# Altium PCB Grabber.PCBDOC (part 3 of 5)
Units mm, origin at the board's own origin, x right, y up, seen from the top; angles counter-clockwise.
Board outline 72.5 x 100 mm, 4 copper layers (TopLayer, Internal Plane 2, Layer 1, Bottom Layer), stack 1.543 mm thick; 160 components, 116 nets, 692 pads, 242 vias.
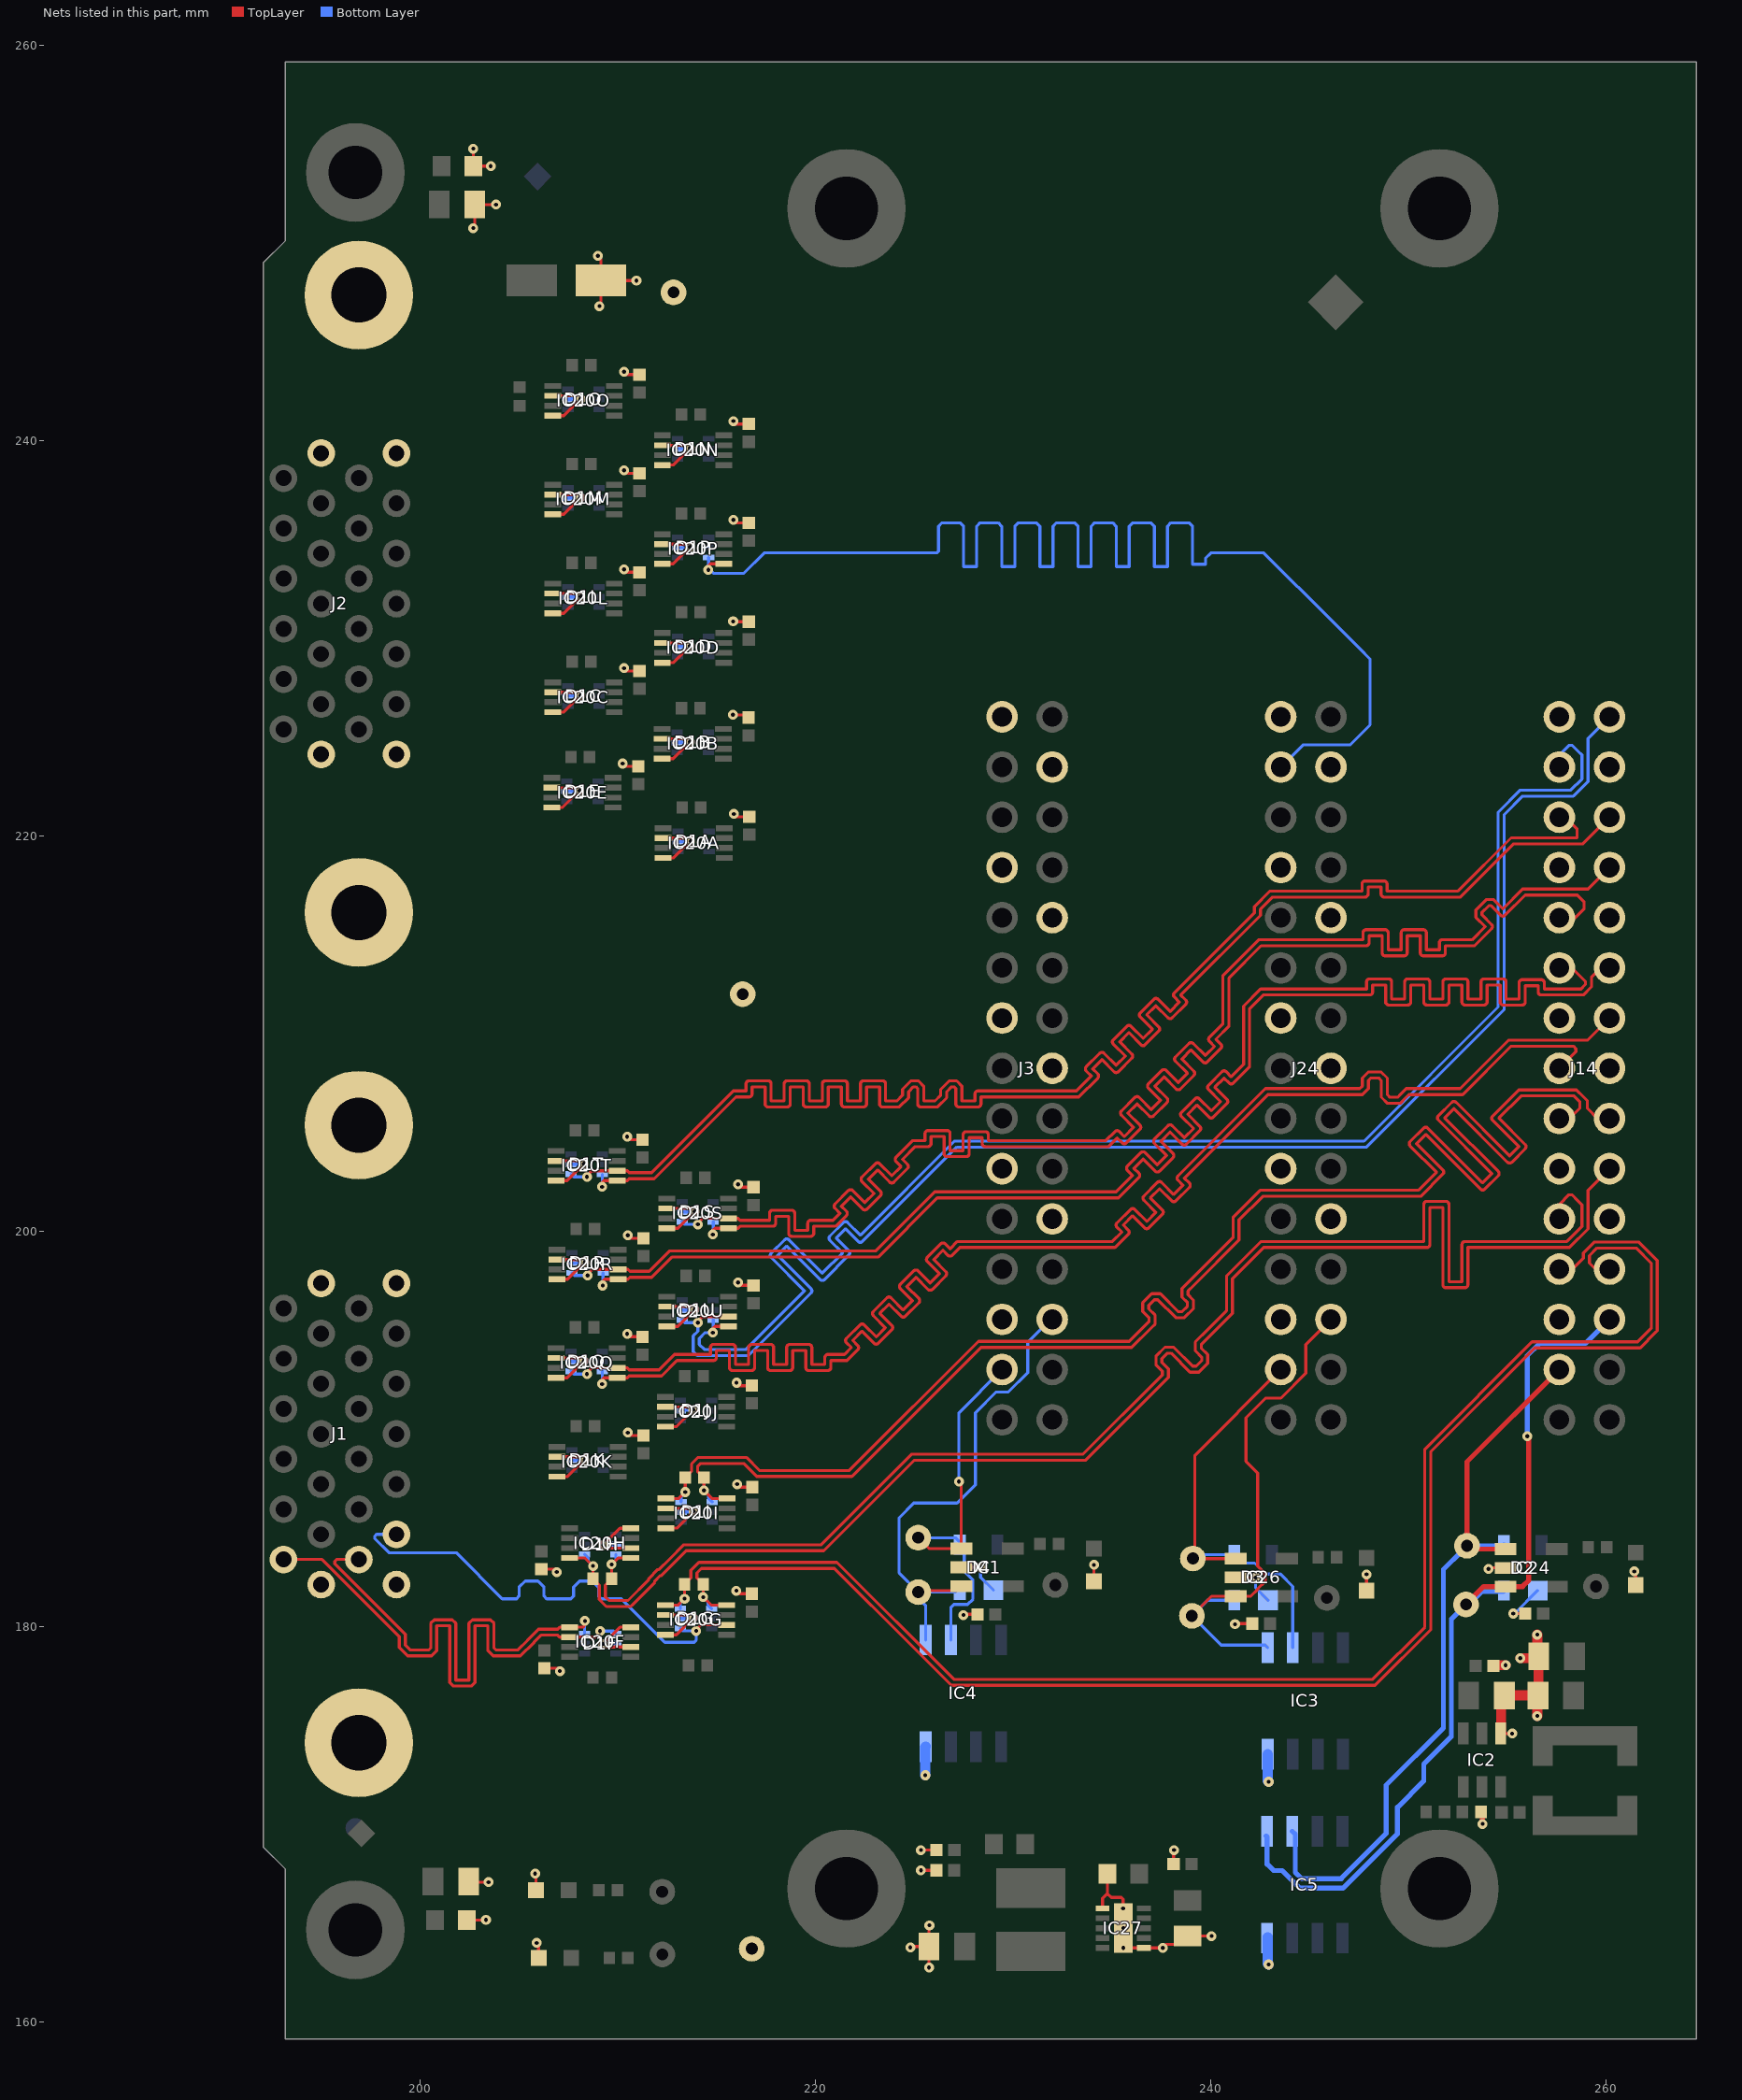
[diagram p4: the nets of this part, all layers, seen from the top]

## Via types
v1: diameter 0.5, hole 0.2, TopLayer to Bottom Layer, tented both sides, 242 vias

## Nets (pads, with @x,y where several pads share a name; then routed paths per layer and width w, separated by ;. In a path a pad name is that pad's centre, name@x,y a point inside that pad or via, vN(x,y) a via of type N, cw(c..) or ccw(c..) an arc to the next point about the centre after c; other vN are vias at no path point) (continued)
CC2_P: D1G.1 IC20G.6 J1.3 | length 25.3
  TopLayer w0.152: v1(213.988,179.79) 213.988,179.859 214.227,180.098 IC20G.6@215.527,180.098
  Bottom Layer w0.152: J1.3@198.826,184.676 197.818,184.676 197.728,184.587 197.728,184.461 198.441,183.748 201.849,183.748 204.178,181.418 204.898,181.418 205.029,181.549 205.029,182.009 205.338,182.318 205.982,182.318 206.291,182.009 206.291,181.549 206.421,181.418 207.487,181.418 207.653,181.418 207.783,181.549 207.783,182.009 208.092,182.318 208.736,182.318 209.045,182.009 209.045,181.549 209.176,181.418 209.925,181.418 210.205,181.418 212.401,179.221 213.892,179.221 213.988,179.317 v1(213.988,179.79) 213.32,179.79 D1G.1@213.187,179.923
CC3_N: D1F.6 IC20F.5 J1.2 | length 26.2
  TopLayer w0.152: J1.2@196.921,183.406 195.795,183.406 195.706,183.317 195.706,183.191 199.271,179.626 199.271,179.077 199.517,178.83 200.304,178.83 200.47,178.83 200.559,178.92 200.559,180.176 200.738,180.354 201.651,180.354 201.829,180.176 201.829,177.306 202.49,177.306 202.49,180.176 202.668,180.354 203.581,180.354 203.76,180.176 203.76,178.92 203.849,178.83 204.617,178.83 204.847,178.83 204.974,178.83 205.467,179.324 205.467,179.336 206.013,179.883 206.987,179.883 207.084,179.98 IC20F.5@207.585,179.98 208.26,179.98 208.362,180.083 v1(208.362,180.296)
  Bottom Layer w0.152: D1F.6@208.345,179.655 208.345,180.279 v1(208.362,180.296)
CC3_P: D1F.1 IC20F.6 J1.15 | length 28.5
  TopLayer w0.152: J1.15@193.111,183.406 195.059,183.406 198.966,179.5 198.966,178.951 199.055,178.861 199.391,178.526 200.304,178.526 200.596,178.526 200.864,178.793 200.864,180.05 201.524,180.05 201.524,177.18 201.703,177.002 202.616,177.002 202.794,177.18 202.794,180.05 203.455,180.05 203.455,178.793 203.723,178.526 204.617,178.526 204.847,178.526 205.1,178.526 205.772,179.197 205.772,179.21 206.14,179.578 206.987,179.578 207.084,179.48 IC20F.6@207.585,179.48 208.885,179.48 209.124,179.719 v1(209.124,179.788)
  Bottom Layer w0.152: v1(209.124,179.788) 209.792,179.788 D1F.1@209.925,179.655
GND: B5.1 B7.1 B9.1 C1.2 C2.2 C3.1 C5.1 C6.1 C7.1 C8.1 C47A.1 C47B.1 C47C.1 C47D.1 C47E.1 C47F.1 C47G.1 C47H.1 C47I.1 C47J.1 C47K.1 C47L.1 C47M.1 C47N.1 C47O.1 C47P.1 C47Q.1 C47R.1 C47S.1 C47T.1 C47U.1 C58.1 C59.1 C62.2 C64.1 C65.1 C66.1 C67.1 C68.1 D1A.2 D1B.2 D1C.2 D1D.2 D1E.2 D1F.2 D1G.2 D1H.2 D1I.2 D1J.2 D1K.2 D1L.2 D1M.2 D1N.2 D1O.2 D1P.2 D1Q.2 D1R.2 D1S.2 D1T.2 D1U.2 D2.1 D3.1 D4.1 IC1.2 IC2.1 IC3.4 IC4.4 IC5.4 IC20A.2 IC20A.4 IC20B.2 IC20B.4 IC20C.2 IC20C.4 IC20D.2 IC20D.4 IC20E.2 IC20E.4 IC20F.2 IC20F.4 IC20G.2 IC20G.4 IC20H.2 IC20H.4 IC20I.2 IC20I.4 IC20J.2 IC20J.4 IC20K.2 IC20K.4 IC20L.2 IC20L.4 IC20M.2 IC20M.4 IC20N.2 IC20N.4 IC20O.2 IC20O.4 IC20P.2 IC20P.4 IC20Q.2 IC20Q.4 IC20R.2 IC20R.4 IC20S.2 IC20S.4 IC20T.2 IC20T.4 IC20U.2 IC20U.4 IC24.2 IC26.2 IC27.1 IC27.6 IC27.11 J1.1 J1.13 J1.14 J1.26 J1.27 J1.28 J2.1 J2.13 J2.14 J2.26 J2.27 J2.28 J3.1 J3.4 J3.7 J3.10 J3.13 J3.16 J3.19 J3.22 J3.25 J14.1 J14.4 J14.7 J14.10 J14.13 J14.16 J14.19 J14.22 J14.25 J24.1 J24.4 J24.7 J24.10 J24.13 J24.16 J24.19 J24.22 J24.25 LD1.1 LD5.1 LD6.1 LD7.1 LD8.1 R5.1 R6.1 R11.1 R122.1 | length 154.5
  TopLayer w0.152: R6.1@202.374,165.156 203.333,165.156 v1(203.352,165.176) ; C2.2@202.474,167.106 202.5,167.081 v1(203.479,167.081) ; v1(202.713,250.757) 202.791,250.835 C1.2@202.791,251.951 v1(203.866,251.951) ; v1(202.713,254.779) R5.1@202.713,253.898 v1(203.592,253.898) ; v1(205.842,167.513) 205.88,167.474 LD6.1@205.88,166.675 ; v1(205.918,164.008) 206.017,163.908 LD5.1@206.017,163.256 ; C47H.1@206.154,182.92 206.911,182.92 206.936,182.895 v1(206.936,182.771) ; C47F.1@206.31,177.905 207.067,177.905 207.092,177.88 v1(207.092,177.756) ; IC20E.4@206.677,221.448 207.227,221.448 v1(208.077,222.298) 207.927,222.448 IC20E.2@206.677,222.448 ; IC20C.4@206.742,226.273 207.292,226.273 v1(208.142,227.123) 207.992,227.273 IC20C.2@206.742,227.273 ; IC20L.4@206.742,231.273 207.292,231.273 v1(208.142,232.123) 207.992,232.273 IC20L.2@206.742,232.273 ; IC20M.4@206.742,236.28 207.292,236.28 v1(208.142,237.13) 207.992,237.28 IC20M.2@206.742,237.28 ; IC20O.4@206.742,241.273 207.292,241.273 v1(208.142,242.123) 207.992,242.273 IC20O.2@206.742,242.273 ; IC20Q.4@206.902,192.598 207.452,192.598 v1(208.302,193.448) 208.152,193.598 IC20Q.2@206.902,193.598 ; IC20T.4@206.902,202.572 207.452,202.572 v1(208.302,203.422) 208.152,203.572 IC20T.2@206.902,203.572 ; IC20K.4@206.937,187.599 207.487,187.599 v1(208.337,188.449) 208.187,188.599 IC20K.2@206.937,188.599 ; IC20R.4@206.937,197.581 207.487,197.581 v1(208.337,198.431) 208.187,198.581 IC20R.2@206.937,198.581 ; v1(209.017,249.357) 209.166,249.208 C62.2@209.166,248.107 ; v1(209.092,246.811) 209.166,246.885 C62.2@209.166,248.107 ; v1(210.27,223.672) 210.27,223.548 210.295,223.523 C47E.1@211.052,223.523 ; v1(210.335,228.497) 210.335,228.373 210.36,228.348 C47C.1@211.117,228.348 ; v1(210.335,233.497) 210.335,233.373 210.36,233.348 C47L.1@211.117,233.348 ; v1(210.335,238.504) 210.335,238.38 210.36,238.355 C47M.1@211.117,238.355 ; v1(210.335,243.497) 210.335,243.373 210.36,243.348 C47O.1@211.117,243.348 ; v1(210.495,194.822) 210.495,194.698 210.52,194.673 C47Q.1@211.277,194.673 ; v1(210.495,204.796) 210.495,204.672 210.52,204.647 C47T.1@211.277,204.647 ; v1(210.53,189.823) 210.53,189.699 210.555,189.674 C47K.1@211.312,189.674 ; v1(210.53,199.805) 210.53,199.681 210.555,199.656 C47R.1@211.312,199.656 ; IC20F.2@210.685,178.98 209.435,178.98 v1(209.285,179.13) 210.135,179.98 IC20F.4@210.685,179.98 ; IC20H.2@210.685,183.98 209.435,183.98 v1(209.285,184.13) 210.135,184.98 IC20H.4@210.685,184.98 ; v1(210.966,248.107) C62.2@209.166,248.107 ; IC20B.4@212.267,223.923 212.817,223.923 v1(213.667,224.773) 213.517,224.923 IC20B.2@212.267,224.923 ; IC20D.4@212.277,228.773 212.827,228.773 v1(213.677,229.623) 213.527,229.773 IC20D.2@212.277,229.773 ; IC20P.4@212.277,233.773 212.827,233.773 v1(213.677,234.623) 213.527,234.773 IC20P.2@212.277,234.773 ; IC20N.4@212.277,238.773 212.827,238.773 v1(213.677,239.623) 213.527,239.773 IC20N.2@212.277,239.773 ; IC20A.4@212.302,218.899 212.852,218.899 v1(213.702,219.749) 213.552,219.899 IC20A.2@212.302,219.899 ; IC20G.4@212.427,179.598 212.977,179.598 v1(213.827,180.448) 213.677,180.598 IC20G.2@212.427,180.598 ; IC20J.4@212.434,190.124 212.984,190.124 v1(213.834,190.974) 213.684,191.124 IC20J.2@212.434,191.124 ; IC20I.4@212.462,184.991 213.012,184.991 v1(213.862,185.841) 213.712,185.991 IC20I.2@212.462,185.991 ; IC20U.4@212.512,195.198 213.062,195.198 v1(213.912,196.048) 213.762,196.198 IC20U.2@212.512,196.198 ; IC20S.4@212.512,200.164 213.062,200.164 v1(213.912,201.014) 213.762,201.164 IC20S.2@212.512,201.164 ; v1(215.849,226.136) 216.505,226.136 C47B.1@216.642,225.998 ; v1(215.86,230.863) 216.087,230.863 216.102,230.848 C47D.1@216.652,230.848 ; v1(215.87,235.997) 215.87,235.873 215.895,235.848 C47P.1@216.652,235.848 ; v1(215.87,240.997) 215.87,240.873 215.895,240.848 C47N.1@216.652,240.848 ; v1(215.895,221.123) 215.895,220.999 215.92,220.974 C47A.1@216.677,220.974 ; v1(216.02,181.822) 216.02,181.698 216.045,181.673 C47G.1@216.802,181.673 ; v1(216.027,192.348) 216.027,192.224 216.052,192.199 C47J.1@216.809,192.199 ; v1(216.055,187.215) 216.055,187.091 216.08,187.066 C47I.1@216.837,187.066 ; v1(216.105,197.422) 216.105,197.298 216.13,197.273 C47U.1@216.887,197.273 ; v1(216.105,202.388) 216.105,202.264 216.13,202.239 C47S.1@216.887,202.239 ; v1(224.824,163.781) 224.875,163.831 C66.1@225.77,163.831 ; v1(225.359,167.681) C59.1@226.142,167.681 ; v1(225.359,168.706) C65.1@226.152,168.706 ; v1(225.77,162.765) C66.1@225.77,163.831 ; v1(225.789,164.898) 225.77,164.879 C66.1@225.77,163.831 ; IC1.2@227.402,183.007 v1(228.376,183.007) ; v1(227.508,180.594) 227.545,180.631 C3.1@228.226,180.631 ; LD7.1@234.112,182.309 v1(234.112,183.134) ; IC27.6@234.542,165.756 234.542,166.256 234.792,166.506 ; R122.1@234.792,167.506 234.792,166.506 ; C67.1@238.142,168.006 238.142,168.681 v1(238.167,168.706) ; v1(240.064,164.356) C68.1@238.842,164.356 238.417,163.931 237.767,163.931 v1(237.592,163.756) IC27.1@236.642,163.756 v1(235.592,163.756) v1(235.592,164.756) 235.585,164.764 235.585,166.217 235.496,166.306 234.992,166.306 234.792,166.506 ; v1(241.249,180.131) 241.28,180.162 C64.1@242.12,180.162 ; IC26.2@241.289,182.497 v1(242.291,182.497) ; LD8.1@247.903,181.826 v1(247.903,182.651) ; v1(254.076,182.931) 254.127,182.982 IC24.2@254.935,182.982 ; IC2.1@254.696,174.603 254.7,174.6 v1(255.27,174.6) ; v1(255.321,180.67) C58.1@255.938,180.67 ; v1(261.446,182.804) 261.518,182.731 LD1.1@261.518,182.106
  TopLayer w0.254: R11.1@253.695,170.637 253.771,170.561 v1(253.771,170.028)
  TopLayer w0.508: C5.1@254.323,178.029 254.348,178.054 v1(254.94,178.054) ; IC2.1@254.696,174.603 254.717,174.624 254.717,176.409 C6.1@254.813,176.505 ; C6.1@254.875,176.53 256.311,176.53 C8.1@256.413,176.632 ; v1(255.676,178.41) 256.518,178.41 C7.1@256.62,178.511 256.54,178.591 v1(256.54,179.603) ; C7.1@256.388,178.384 256.6,178.172 256.6,176.55 C8.1@256.58,176.53 256.54,176.49 v1(256.54,175.489)
  Bottom Layer w0.152: D1E.2@207.437,222.273 208.052,222.273 v1(208.077,222.298) ; D1C.2@207.502,227.098 208.117,227.098 v1(208.142,227.123) ; D1L.2@207.502,232.098 208.117,232.098 v1(208.142,232.123) ; D1M.2@207.502,237.105 208.117,237.105 v1(208.142,237.13) ; D1O.2@207.502,242.098 208.117,242.098 v1(208.142,242.123) ; D1Q.2@207.662,193.423 208.277,193.423 v1(208.302,193.448) ; D1T.2@207.662,203.397 208.277,203.397 v1(208.302,203.422) ; D1K.2@207.697,188.424 208.312,188.424 v1(208.337,188.449) ; D1R.2@207.697,198.406 208.312,198.406 v1(208.337,198.431) ; v1(209.285,179.13) 209.31,179.155 D1F.2@209.925,179.155 ; v1(209.285,184.13) 209.31,184.155 D1H.2@209.925,184.155 ; D1B.2@213.027,224.748 213.642,224.748 v1(213.667,224.773) ; D1D.2@213.037,229.598 213.652,229.598 v1(213.677,229.623) ; D1P.2@213.037,234.598 213.652,234.598 v1(213.677,234.623) ; D1N.2@213.037,239.598 213.652,239.598 v1(213.677,239.623) ; D1A.2@213.062,219.724 213.677,219.724 v1(213.702,219.749) ; D1G.2@213.187,180.423 213.802,180.423 v1(213.827,180.448) ; D1J.2@213.194,190.949 213.809,190.949 v1(213.834,190.974) ; D1I.2@213.222,185.816 213.837,185.816 v1(213.862,185.841) ; D1U.2@213.272,196.023 213.887,196.023 v1(213.912,196.048) ; D1S.2@213.272,200.989 213.887,200.989 v1(213.912,201.014) ; v1(228.376,183.007) 228.376,182.507 D4.1@229.027,181.857 ; v1(242.291,182.497) 242.291,181.97 D3.1@242.914,181.347 ; v1(255.321,180.67) 255.399,180.67 D2.1@256.56,181.832
  Bottom Layer w0.508: v1(225.577,172.491) 225.577,173.914 IC4.4@225.603,173.939 ; IC5.4@242.9,164.305 242.9,162.966 v1(242.951,162.916) ; IC3.4@242.9,173.551 242.9,172.212 v1(242.951,172.161)
  other v1: 235.585,165.756
I2C0_SCL: B2.1 D2.3 IC5.6 IC24.1 J14.27 | length 38.7
  TopLayer w0.254: IC24.1@254.935,183.932 253.152,183.932 B2.1@252.984,184.099 252.984,188.341 J14.27@257.658,193.015
  Bottom Layer w0.254: IC5.6@244.145,169.654 244.297,169.502 244.297,167.58 244.618,167.259 246.618,167.259 248.895,169.536 248.895,171.983 251.79,174.879 251.79,182.905 252.705,183.82 B2.1@252.705,184.125 ; B2.1@252.984,184.099 254.828,184.099 D2.3@254.86,184.132
I2C0_SDA: B1.1 D2.2 IC5.5 IC24.3 J14.26 | length 44.9
  TopLayer w0.254: B1.1@252.933,181.13 253.835,182.032 255.793,182.032 256.108,182.347 256.108,189.56 v1(256.032,189.636)
  Bottom Layer w0.254: IC5.5@242.824,169.418 242.875,169.367 242.875,167.996 243.205,167.665 243.637,167.665 244.526,166.776 246.71,166.776 249.466,169.532 249.466,170.865 250.8,172.199 250.8,173.05 252.197,174.447 252.197,180.394 B1.1@252.933,181.13 253.092,181.13 253.742,181.78 254.808,181.78 D2.2@254.86,181.832 ; v1(256.032,189.636) 256.032,193.708 256.659,194.335 258.978,194.335 J14.26@260.198,195.555
I2C1_SCL: B4.1 D3.3 IC3.6 IC26.1 J24.27 | length 22.6
  TopLayer w0.152: IC26.1@241.289,183.447 239.128,183.447 B4.1@239.117,183.457 239.221,183.56 239.221,188.675 J24.27@243.561,193.015
  Bottom Layer w0.152: B4.1@239.117,183.457 239.117,183.513 cw(c239.27,183.512) 239.163,183.62 cw(c239.361,183.418) 239.47,183.679 239.548,183.647 D3.3@241.198,183.647 ; D3.3@241.198,183.642 241.198,183.462 241.437,183.223 242.241,183.223 242.796,182.668 243.544,182.668 244.17,182.042 IC3.6@244.17,178.951
I2C1_SDA: B3.1 D3.2 IC3.5 IC26.3 J24.26 | length 27
  TopLayer w0.152: B3.1@239.068,180.552 240.062,181.547 242.049,181.547 242.393,181.891 242.393,181.923 242.769,182.298 242.769,182.695 242.393,183.071 242.393,187.781 241.803,188.371 241.803,190.577 242.793,191.567 243.568,191.567 244.831,192.83 244.831,194.285 J24.26@246.101,195.555
  Bottom Layer w0.152: B3.1@239.068,180.552 239.862,181.347 D3.2@241.214,181.347 ; B3.1@239.268,180.365 239.268,180.353 240.551,179.07 242.781,179.07 IC3.5@242.9,178.951
I2C2_SCL: B15.1 D4.3 IC1.1 IC4.6 J3.27 | length 20.5
  TopLayer w0.152: B15.1@225.222,184.506 225.77,183.957 IC1.1@227.402,183.957 227.402,187.228 v1(227.279,187.35)
  Bottom Layer w0.152: B15.1@225.222,184.506 227.103,184.506 227.327,184.282 D4.3@227.327,184.157 ; IC4.6@226.873,179.339 226.873,180.975 227.026,181.128 227.721,181.128 227.99,181.398 227.99,182.363 227.55,182.803 227.55,183.879 D4.3@227.432,183.998 ; v1(227.279,187.35) 227.279,190.83 J3.27@229.464,193.015
I2C2_SDA: B14.1 D4.2 IC1.3 IC4.5 J3.26 | length 26.5
  TopLayer w0.152: B14.1@225.222,181.757 225.298,181.833 227.178,181.833 IC1.3@227.402,182.057
  Bottom Layer w0.152: B14.1@225.146,181.559 225.146,181.523 225.603,181.066 IC4.5@225.603,179.339 ; D4.2@227.327,181.857 227.327,181.92 227.103,182.143 227.103,181.757 B14.1@225.222,181.757 224.257,182.722 224.257,185.515 224.998,186.256 227.188,186.256 228.117,187.186 228.117,190.83 229.162,191.874 229.778,191.874 230.759,192.855 230.759,194.386 231.927,195.555 J3.26@232.004,195.555
LVDS0_N: D1U.6 IC20U.5 J14.3 | length 75.8
  TopLayer w0.152: v1(214.835,194.882) 214.835,195.096 214.938,195.198 IC20U.5@215.612,195.198
  Bottom Layer w0.152: D1U.6@214.852,195.523 214.852,194.899 v1(214.835,194.882) 214.439,194.882 214.147,194.591 214.147,194.281 214.398,194.031 216.51,194.031 219.473,196.994 217.785,198.683 cw(c217.893,198.79) 217.785,198.898 ; 217.785,198.898 218.467,199.581 cw(c218.575,199.473) 218.683,199.581 ; 218.683,199.58 220.371,197.892 221.394,198.915 220.754,199.555 cw(c220.862,199.663) 220.754,199.771 221.437,200.453 cw(c221.544,200.345) 221.652,200.453 222.292,199.813 227.051,204.572 247.777,204.572 254.559,211.353 254.559,221.208 255.677,222.326 258.242,222.326 258.801,222.885 258.801,224.104 258.623,224.282 258.318,224.587 258.14,224.587 257.658,224.104 J14.3@257.658,223.495 J14.3@257.835,223.495
LVDS0_P: D1U.1 IC20U.6 J14.2 | length 77.9
  TopLayer w0.152: v1(214.073,195.39) 214.073,195.459 214.312,195.698 IC20U.6@215.612,195.698
  Bottom Layer w0.152: D1U.1@213.272,195.523 213.405,195.39 v1(214.073,195.39) 214.073,194.948 213.843,194.717 213.843,193.92 214.037,193.726 216.636,193.726 216.725,193.815 219.796,196.886 ccw(c219.689,196.994) 219.841,196.994 ccw(c219.689,196.994) 219.797,197.102 ; 219.796,197.102 218.108,198.79 218.575,199.257 220.263,197.569 ccw(c220.371,197.677) 220.479,197.569 221.717,198.807 ccw(c221.61,198.915) 221.762,198.915 ccw(c221.61,198.915) 221.717,199.023 221.078,199.663 221.544,200.13 222.184,199.49 ccw(c222.292,199.598) 222.4,199.49 227.177,204.267 247.903,204.267 254.864,211.227 254.864,221.082 255.803,222.021 258.368,222.021 259.105,222.759 259.105,224.942 J14.2@260.198,226.035
LVDS1_N: D1T.6 IC20T.5 J14.6 | length 76.7
  TopLayer w0.152: v1(209.225,202.256) 209.225,202.47 209.328,202.572 IC20T.5@210.002,202.572 210.504,202.572 210.601,202.67 211.864,202.67 216.001,206.807 216.662,206.807 ccw(c216.662,206.959) 216.814,206.959 216.814,207.315 217.475,207.315 217.475,206.451 ccw(c217.627,206.451) 217.627,206.299 218.592,206.299 ccw(c218.592,206.451) 218.745,206.451 218.745,207.315 219.405,207.315 219.405,206.451 ccw(c219.558,206.451) 219.558,206.299 220.523,206.299 ccw(c220.523,206.451) 220.675,206.451 220.675,207.315 221.336,207.315 221.336,206.451 ccw(c221.488,206.451) 221.488,206.299 222.453,206.299 ccw(c222.453,206.451) 222.606,206.451 222.606,207.315 223.266,207.315 223.266,206.451 ccw(c223.418,206.451) 223.418,206.299 224.268,206.299 224.732,206.763 224.732,207.066 224.981,207.315 225.107,207.315 225.196,207.225 225.196,206.451 ccw(c225.349,206.451) 225.349,206.299 226.199,206.299 226.663,206.763 226.663,207.066 226.911,207.315 227.038,207.315 227.127,207.225 227.127,206.451 ccw(c227.279,206.451) 227.279,206.299 228.244,206.299 ccw(c228.244,206.451) 228.397,206.451 228.397,206.807 233.349,206.807 234.301,207.758 ; 234.3,207.758 ccw(c234.193,207.866) 234.345,207.866 ccw(c234.193,207.866) 234.301,207.974 234.049,208.225 234.516,208.692 235.127,208.082 ccw(c235.235,208.189) 235.343,208.082 236.025,208.764 ccw(c235.917,208.872) 236.069,208.872 ccw(c235.917,208.872) 236.025,208.98 235.414,209.59 235.881,210.057 236.492,209.447 ccw(c236.6,209.554) 236.708,209.447 237.39,210.129 ccw(c237.282,210.237) 237.434,210.237 ccw(c237.282,210.237) 237.39,210.345 236.779,210.955 237.246,211.422 237.857,210.812 ccw(c237.965,210.919) 238.073,210.812 ; 238.072,210.812 238.755,211.494 ccw(c238.647,211.602) 238.799,211.602 ccw(c238.647,211.602) 238.755,211.71 238.503,211.961 242.532,215.99 242.532,216.301 243.147,216.916 247.828,216.916 ccw(c247.828,217.068) 247.98,217.068 247.98,217.424 248.641,217.424 248.641,217.068 ccw(c248.793,217.068) 248.793,216.916 252.653,216.916 255.345,219.608 258.547,219.608 258.851,219.608 J14.6@260.198,220.955
  Bottom Layer w0.152: v1(209.225,202.256) 209.242,202.273 D1T.6@209.242,202.897
LVDS1_P: D1T.1 IC20T.6 J14.5 | length 76.9
  TopLayer w0.152: v1(208.463,202.764) 208.463,202.833 208.702,203.072 IC20T.6@210.002,203.072 210.504,203.072 210.601,202.975 211.738,202.975 215.875,207.112 216.51,207.112 216.51,207.467 cw(c216.662,207.467) 216.662,207.62 217.627,207.62 cw(c217.627,207.467) 217.78,207.467 217.78,206.604 218.44,206.604 218.44,207.467 cw(c218.592,207.467) 218.592,207.62 219.558,207.62 cw(c219.558,207.467) 219.71,207.467 219.71,206.604 220.37,206.604 220.37,207.467 cw(c220.523,207.467) 220.523,207.62 221.488,207.62 cw(c221.488,207.467) 221.64,207.467 221.64,206.604 222.301,206.604 222.301,207.467 cw(c222.453,207.467) 222.453,207.62 223.418,207.62 cw(c223.418,207.467) 223.571,207.467 223.571,206.604 224.142,206.604 224.427,206.889 224.427,207.192 224.855,207.62 225.233,207.62 225.501,207.352 225.501,206.604 226.072,206.604 226.358,206.889 226.358,207.192 226.785,207.62 227.164,207.62 227.432,207.352 227.432,206.604 228.092,206.604 228.092,206.959 cw(c228.244,206.959) 228.244,207.112 233.223,207.112 233.977,207.866 233.726,208.118 cw(c233.834,208.225) 233.726,208.334 ; 233.726,208.333 234.408,209.016 cw(c234.516,208.908) 234.624,209.015 ; 234.624,209.016 235.235,208.405 235.702,208.872 235.091,209.483 cw(c235.199,209.59) 235.091,209.699 235.773,210.381 cw(c235.881,210.273) 235.989,210.38 236.6,209.77 237.067,210.237 236.456,210.848 cw(c236.564,210.955) 236.456,211.063 237.138,211.746 cw(c237.246,211.638) 237.354,211.746 237.965,211.135 238.432,211.602 238.18,211.853 cw(c238.288,211.961) 238.181,212.069 ; 238.18,212.069 242.227,216.116 242.227,216.427 243.021,217.221 247.675,217.221 247.675,217.576 cw(c247.828,217.576) 247.828,217.729 248.793,217.729 cw(c248.793,217.576) 248.945,217.576 248.945,217.221 252.527,217.221 255.219,219.913 258.547,219.913 258.547,220.37 258.115,220.802 J14.5@257.658,220.802
  Bottom Layer w0.152: D1T.1@207.662,202.897 207.795,202.764 v1(208.463,202.764)
LVDS2_N: D1S.6 IC20S.5 J14.9 | length 75.5
  TopLayer w0.152: v1(214.835,199.848) 214.835,200.062 214.938,200.164 IC20S.5@215.612,200.164 216.114,200.164 216.211,200.262 217.856,200.262 ccw(c217.856,200.414) 218.008,200.414 218.008,200.77 218.669,200.77 218.669,199.906 ccw(c218.821,199.906) 218.821,199.754 219.786,199.754 ccw(c219.786,199.906) 219.939,199.906 219.939,200.262 221.038,200.262 221.586,200.81 ccw(c221.478,200.917) 221.631,200.917 ccw(c221.478,200.917) 221.586,201.025 221.335,201.277 221.802,201.743 222.412,201.133 ccw(c222.52,201.241) 222.628,201.133 ; 222.628,201.133 223.31,201.815 ccw(c223.202,201.923) 223.355,201.923 ccw(c223.202,201.923) 223.31,202.031 222.7,202.642 223.167,203.108 223.777,202.498 ccw(c223.885,202.606) 223.993,202.498 ; 223.993,202.498 224.675,203.18 ccw(c224.567,203.288) 224.72,203.288 ccw(c224.567,203.288) 224.675,203.396 224.424,203.647 225.069,204.292 225.717,204.292 ccw(c225.717,204.445) 225.869,204.445 225.869,204.8 226.53,204.8 226.53,203.937 ccw(c226.682,203.937) 226.682,203.784 227.647,203.784 ccw(c227.647,203.937) 227.8,203.937 227.8,204.744 228.46,204.744 228.46,204.445 ccw(c228.612,204.445) 228.612,204.292 234.848,204.292 235.287,204.732 235.539,204.481 ccw(c235.647,204.588) 235.755,204.481 ; 235.754,204.481 236.437,205.163 ; 236.436,205.163 ccw(c236.329,205.271) 236.482,205.271 ccw(c236.329,205.271) 236.437,205.379 235.826,205.989 236.293,206.456 236.904,205.846 ccw(c237.012,205.953) 237.12,205.846 ; 237.119,205.846 237.802,206.528 ccw(c237.694,206.636) 237.847,206.636 ccw(c237.694,206.636) 237.801,206.744 ; 237.802,206.744 237.191,207.354 237.658,207.821 238.269,207.211 ccw(c238.377,207.318) 238.485,207.211 239.167,207.893 ccw(c239.059,208.001) 239.212,208.001 ccw(c239.059,208.001) 239.167,208.109 238.556,208.719 239.023,209.186 239.634,208.576 ccw(c239.742,208.683) 239.85,208.576 240.532,209.258 ccw(c240.424,209.366) 240.577,209.366 ccw(c240.424,209.366) 240.532,209.474 240.299,209.707 240.28,209.725 240.944,210.389 240.944,212.827 242.57,214.452 247.879,214.452 ccw(c247.879,214.605) 248.031,214.605 248.031,214.96 248.057,214.96 248.691,214.96 248.691,214.097 ccw(c248.844,214.097) 248.844,213.944 249.809,213.944 ccw(c249.809,214.097) 249.961,214.097 249.961,214.96 250.622,214.96 250.622,214.097 ccw(c250.774,214.097) 250.774,213.944 251.739,213.944 ccw(c251.739,214.097) 251.892,214.097 251.892,214.426 251.892,214.452 253.364,214.452 254.227,215.315 ccw(c254.119,215.422) 254.271,215.422 ccw(c254.119,215.422) 254.227,215.53 253.743,216.014 253.743,216.14 254.083,216.481 254.21,216.481 254.694,215.997 ccw(c254.801,216.105) 254.91,215.997 ; 254.909,215.997 255.93,217.018 258.572,217.018 258.902,216.687 258.902,216.306 258.47,215.875 J14.9@257.658,215.875
  Bottom Layer w0.152: v1(214.835,199.848) 214.852,199.865 D1S.6@214.852,200.489
LVDS2_P: D1S.1 IC20S.6 J14.8 | length 76.1
  TopLayer w0.152: v1(214.073,200.356) 214.073,200.425 214.312,200.664 IC20S.6@215.612,200.664 216.114,200.664 216.211,200.567 217.703,200.567 217.703,200.922 cw(c217.856,200.922) 217.856,201.075 218.821,201.075 cw(c218.821,200.922) 218.973,200.922 218.973,200.059 219.634,200.059 219.634,200.414 cw(c219.786,200.414) 219.786,200.567 220.912,200.567 221.263,200.917 221.011,201.169 cw(c221.119,201.277) 221.012,201.385 ; 221.011,201.384 221.694,202.067 cw(c221.802,201.959) 221.91,202.066 ; 221.909,202.067 222.52,201.456 222.987,201.923 222.376,202.534 cw(c222.484,202.642) 222.377,202.75 ; 222.376,202.749 223.059,203.432 ; 223.058,203.431 cw(c223.167,203.324) 223.274,203.432 223.885,202.821 224.352,203.288 224.1,203.54 cw(c224.208,203.647) 224.101,203.756 224.942,204.597 225.564,204.597 225.564,204.953 cw(c225.717,204.953) 225.717,205.105 226.682,205.105 cw(c226.682,204.953) 226.834,204.953 226.834,204.089 227.495,204.089 227.495,204.896 cw(c227.647,204.896) 227.647,205.049 228.612,205.049 cw(c228.612,204.896) 228.765,204.896 228.765,204.597 234.721,204.597 235.18,205.055 cw(c235.287,204.947) 235.395,205.055 235.647,204.804 236.114,205.271 235.503,205.881 cw(c235.611,205.989) 235.503,206.097 ; 235.503,206.097 236.185,206.779 cw(c236.293,206.672) 236.401,206.779 ; 236.401,206.779 237.012,206.169 237.479,206.636 236.868,207.246 ; 236.868,207.246 cw(c236.976,207.354) 236.868,207.462 237.55,208.144 cw(c237.658,208.037) 237.766,208.144 238.377,207.534 238.844,208.001 238.233,208.611 cw(c238.341,208.719) 238.233,208.827 238.915,209.509 cw(c239.023,209.402) 239.131,209.509 239.742,208.899 240.209,209.366 239.957,209.617 cw(c240.065,209.725) 239.958,209.833 240.64,210.515 240.64,212.953 242.444,214.757 247.726,214.757 247.726,215.113 cw(c247.879,215.113) 247.879,215.265 248.844,215.265 cw(c248.844,215.113) 248.996,215.113 248.996,214.249 249.657,214.249 249.657,215.113 cw(c249.809,215.113) 249.809,215.265 250.774,215.265 cw(c250.774,215.113) 250.927,215.113 250.927,214.249 251.587,214.249 251.587,214.605 cw(c251.739,214.605) 251.739,214.757 253.238,214.757 253.903,215.422 253.438,215.888 253.438,216.266 253.957,216.786 254.336,216.786 254.801,216.32 255.803,217.322 258.47,217.322 259.105,217.322 J14.8@260.198,218.415
  Bottom Layer w0.152: D1S.1@213.272,200.489 213.405,200.356 v1(214.073,200.356)
LVDS3_N: D1R.6 IC20R.5 J14.12 | length 75.4
  TopLayer w0.152: v1(209.26,197.265) 209.26,197.479 209.363,197.581 IC20R.5@210.037,197.581 210.539,197.581 210.636,197.679 211.734,197.679 212.759,198.704 223.19,198.704 226.187,201.701 235.356,201.701 236.383,202.728 ccw(c236.275,202.837) 236.428,202.837 ccw(c236.275,202.837) 236.383,202.944 236.132,203.196 236.599,203.663 237.209,203.052 ccw(c237.317,203.16) 237.425,203.053 238.107,203.735 ccw(c238,203.842) 238.152,203.842 ccw(c238,203.842) 238.107,203.95 237.497,204.561 237.964,205.028 238.574,204.417 ccw(c238.682,204.525) 238.79,204.418 239.472,205.099 ccw(c239.365,205.207) 239.517,205.207 ccw(c239.365,205.207) 239.472,205.315 238.862,205.926 239.329,206.393 239.939,205.782 ccw(c240.047,205.89) 240.155,205.783 240.837,206.465 ccw(c240.73,206.572) 240.882,206.572 ccw(c240.73,206.572) 240.837,206.68 240.227,207.291 240.694,207.758 240.945,207.506 ccw(c241.053,207.614) 241.161,207.507 241.986,208.332 241.986,211.277 242.672,211.963 248.056,211.963 ccw(c248.056,212.115) 248.209,212.115 248.209,212.471 248.869,212.471 248.869,211.607 ccw(c249.022,211.607) 249.022,211.455 249.987,211.455 ccw(c249.987,211.607) 250.139,211.607 250.139,212.471 250.8,212.471 250.8,211.607 ccw(c250.952,211.607) 250.952,211.455 251.917,211.455 ccw(c251.917,211.607) 252.07,211.607 252.07,212.471 252.73,212.471 252.73,211.607 ccw(c252.882,211.607) 252.882,211.455 253.848,211.455 ccw(c253.848,211.607) 254,211.607 254,212.471 254.66,212.471 254.66,211.607 ccw(c254.813,211.607) 254.813,211.455 255.778,211.455 ccw(c255.778,211.607) 255.93,211.607 255.93,212.435 256.591,212.435 256.591,212.115 ccw(c256.743,212.115) 256.743,211.963 258.876,211.963 259.283,212.37 259.283,212.852 259.766,213.335 J14.12@260.198,213.335
  Bottom Layer w0.152: v1(209.26,197.265) 209.277,197.282 D1R.6@209.277,197.906
LVDS3_P: D1R.1 IC20R.6 J14.11 | length 76
  TopLayer w0.152: v1(208.498,197.773) 208.498,197.842 208.737,198.081 IC20R.6@210.037,198.081 210.539,198.081 210.636,197.984 211.607,197.984 212.633,199.009 223.064,199.009 226.061,202.006 235.229,202.006 236.06,202.837 235.808,203.088 cw(c235.916,203.196) 235.809,203.304 236.491,203.986 cw(c236.599,203.878) 236.707,203.986 237.317,203.375 237.784,203.842 237.173,204.453 cw(c237.281,204.561) 237.174,204.669 ; 237.173,204.669 237.856,205.351 cw(c237.964,205.243) 238.072,205.351 ; 238.071,205.351 238.682,204.74 239.149,205.207 238.538,205.818 cw(c238.646,205.926) 238.538,206.034 239.221,206.716 cw(c239.329,206.608) 239.436,206.716 240.047,206.105 240.514,206.572 239.903,207.183 cw(c240.011,207.291) 239.904,207.399 ; 239.903,207.399 240.586,208.081 cw(c240.694,207.973) 240.801,208.081 241.053,207.83 241.681,208.458 241.681,211.403 242.545,212.268 247.904,212.268 247.904,212.623 cw(c248.056,212.623) 248.056,212.776 249.022,212.776 cw(c249.022,212.623) 249.174,212.623 249.174,211.76 249.834,211.76 249.834,212.623 cw(c249.987,212.623) 249.987,212.776 250.952,212.776 cw(c250.952,212.623) 251.104,212.623 251.104,211.76 251.765,211.76 251.765,212.623 cw(c251.917,212.623) 251.917,212.776 252.882,212.776 cw(c252.882,212.623) 253.035,212.623 253.035,211.76 253.695,211.76 253.695,212.623 cw(c253.848,212.623) 253.848,212.776 254.813,212.776 cw(c254.813,212.623) 254.965,212.623 254.965,211.76 255.626,211.76 255.626,212.587 cw(c255.778,212.587) 255.778,212.74 256.743,212.74 cw(c256.743,212.587) 256.896,212.587 256.896,212.268 258.75,212.268 258.978,212.496 258.978,212.649 258.293,213.335 J14.11@257.658,213.335
  Bottom Layer w0.152: D1R.1@207.697,197.906 207.83,197.773 v1(208.498,197.773)
LVDS4_N: D1Q.6 IC20Q.5 J14.15 | length 76.3
  TopLayer w0.152: v1(209.225,192.282) 209.225,192.496 209.328,192.598 IC20Q.5@210.002,192.598 210.504,192.598 210.601,192.696 212.242,192.696 213.017,193.472 214.86,193.472 ccw(c214.86,193.624) 215.012,193.624 215.012,193.98 215.673,193.98 215.673,193.116 ccw(c215.825,193.116) 215.825,192.964 216.79,192.964 ccw(c216.79,193.116) 216.943,193.116 216.943,193.98 217.603,193.98 217.603,193.116 ccw(c217.756,193.116) 217.756,192.964 218.721,192.964 ccw(c218.721,193.116) 218.873,193.116 218.873,193.98 219.534,193.98 219.534,193.116 ccw(c219.686,193.116) 219.686,192.964 220.651,192.964 ccw(c220.651,193.116) 220.804,193.116 220.804,193.472 221.615,193.472 222.163,194.019 ccw(c222.055,194.127) 222.207,194.127 ccw(c222.055,194.127) 222.163,194.235 221.911,194.486 222.378,194.953 222.989,194.343 ccw(c223.096,194.45) 223.205,194.343 ; 223.204,194.343 223.887,195.025 ccw(c223.779,195.133) 223.931,195.133 ccw(c223.779,195.133) 223.887,195.241 223.276,195.851 223.743,196.318 224.354,195.708 ccw(c224.461,195.815) 224.57,195.708 ; 224.569,195.708 225.252,196.39 ; 225.251,196.39 ccw(c225.144,196.498) 225.296,196.498 ccw(c225.144,196.498) 225.252,196.606 224.641,197.216 225.108,197.683 225.719,197.073 ccw(c225.826,197.18) 225.935,197.073 ; 225.934,197.073 226.617,197.755 ccw(c226.509,197.863) 226.661,197.863 ccw(c226.509,197.863) 226.617,197.971 226.006,198.581 226.473,199.048 226.724,198.797 ccw(c226.832,198.905) 226.94,198.797 227.33,199.187 235.178,199.187 235.85,199.859 ccw(c235.742,199.966) 235.894,199.966 ccw(c235.742,199.966) 235.85,200.074 235.598,200.326 236.065,200.793 236.676,200.182 ccw(c236.784,200.29) 236.892,200.182 237.574,200.864 ccw(c237.466,200.972) 237.619,200.972 ccw(c237.466,200.972) 237.574,201.08 236.963,201.691 237.43,202.158 238.041,201.547 ccw(c238.149,201.655) 238.257,201.547 ; 238.256,201.547 238.939,202.229 ccw(c238.831,202.337) 238.984,202.337 ccw(c238.831,202.337) 238.939,202.445 238.687,202.696 242.912,206.921 247.396,206.921 247.688,206.921 247.997,207.23 247.997,207.634 248.127,207.765 248.519,207.765 248.649,207.634 248.649,206.791 248.958,206.482 249.602,206.482 249.911,206.791 250.042,206.921 250.988,206.921 252.767,206.921 255.218,209.372 258.369,209.372 258.496,209.245 258.496,209.093 J14.15@257.658,208.255
  Bottom Layer w0.152: v1(209.225,192.282) 209.242,192.299 D1Q.6@209.242,192.923
LVDS4_P: D1Q.1 IC20Q.6 J14.14 | length 77.9
  TopLayer w0.152: v1(208.463,192.79) 208.463,192.859 208.702,193.098 IC20Q.6@210.002,193.098 210.504,193.098 210.601,193.001 212.115,193.001 212.891,193.777 214.708,193.777 214.708,194.132 cw(c214.86,194.132) 214.86,194.285 215.825,194.285 cw(c215.825,194.132) 215.978,194.132 215.978,193.269 216.638,193.269 216.638,194.132 cw(c216.79,194.132) 216.79,194.285 217.756,194.285 cw(c217.756,194.132) 217.908,194.132 217.908,193.269 218.568,193.269 218.568,194.132 cw(c218.721,194.132) 218.721,194.285 219.686,194.285 cw(c219.686,194.132) 219.838,194.132 219.838,193.269 220.499,193.269 220.499,193.624 cw(c220.651,193.624) 220.651,193.777 221.489,193.777 221.839,194.127 221.588,194.379 cw(c221.696,194.486) 221.588,194.595 222.27,195.277 cw(c222.378,195.169) 222.486,195.276 223.096,194.666 223.563,195.133 222.953,195.744 cw(c223.061,195.851) 222.953,195.96 ; 222.953,195.959 223.635,196.642 cw(c223.743,196.534) 223.851,196.641 ; 223.851,196.642 224.461,196.031 224.928,196.498 224.318,197.109 cw(c224.426,197.216) 224.318,197.324 225,198.007 cw(c225.108,197.899) 225.216,198.007 225.826,197.396 226.293,197.863 225.683,198.474 cw(c225.791,198.581) 225.683,198.69 226.365,199.372 cw(c226.473,199.264) 226.581,199.372 226.832,199.12 227.204,199.492 235.052,199.492 235.526,199.966 235.275,200.218 cw(c235.383,200.326) 235.275,200.434 235.957,201.116 cw(c236.065,201.008) 236.173,201.115 236.784,200.505 237.251,200.972 236.64,201.583 cw(c236.748,201.691) 236.64,201.799 ; 236.64,201.798 237.322,202.481 cw(c237.43,202.373) 237.538,202.48 ; 237.538,202.481 238.149,201.87 238.597,202.319 238.616,202.337 238.364,202.589 cw(c238.472,202.696) 238.365,202.805 ; 238.364,202.804 242.786,207.226 247.396,207.226 247.561,207.226 247.692,207.357 247.692,207.761 248.001,208.07 248.645,208.07 248.954,207.761 248.954,206.917 249.084,206.786 249.476,206.786 249.606,206.917 249.915,207.226 250.988,207.226 252.641,207.226 255.092,209.677 258.369,209.677 259.08,209.677 J14.14@260.198,210.795
  Bottom Layer w0.152: D1Q.1@207.662,192.923 207.795,192.79 v1(208.463,192.79)
LVDS5_N: D1I.3 IC20I.1 J14.18 R131I.1 | length 77.9
  TopLayer w0.152: IC20I.1@212.462,186.491 213.112,186.491 v1(213.437,186.816) R131I.1@213.437,187.541 213.755,187.859 213.755,188.239 214.086,188.57 216.524,188.57 217.184,187.91 221.743,187.91 228.27,194.437 235.895,194.437 236.788,195.33 236.905,195.447 236.905,195.632 236.579,195.958 236.579,196.395 237.035,196.85 237.472,196.85 238.379,195.943 238.563,195.943 238.84,196.22 238.84,196.404 238.57,196.675 238.57,197.112 238.939,197.481 241.148,199.69 241.148,200.71 242.52,202.082 250.52,202.082 251.439,203.002 250.11,204.331 cw(c250.218,204.439) 250.111,204.547 ; 250.11,204.546 250.793,205.229 cw(c250.901,205.121) 251.009,205.228 ; 251.008,205.229 253.774,202.463 254.241,202.93 251.536,205.636 ; 251.536,205.635 cw(c251.643,205.743) 251.536,205.851 252.218,206.534 cw(c252.326,206.426) 252.434,206.533 255.139,203.828 255.606,204.295 254.277,205.624 cw(c254.385,205.732) 254.278,205.84 ; 254.277,205.839 255.6,207.162 258.52,207.162 258.915,206.768 259.079,206.604 259.079,206.223 259.588,205.715 259.968,205.715 J14.18@260.198,205.715
  Bottom Layer w0.152: D1I.3@213.222,186.316 213.222,186.601 v1(213.437,186.816)
LVDS5_P: D1I.4 IC20I.8 J14.17 R131I.2 | length 77
  TopLayer w0.152: IC20I.8@215.562,186.491 214.781,186.491 v1(214.377,186.895) R131I.2@214.377,187.541 214.06,187.859 214.06,188.112 214.212,188.265 216.398,188.265 217.058,187.605 221.869,187.605 228.396,194.132 236.021,194.132 237.004,195.115 237.21,195.321 237.21,195.758 236.884,196.084 236.884,196.268 237.161,196.545 237.346,196.545 238.252,195.638 238.689,195.638 239.145,196.094 239.145,196.531 238.874,196.801 238.874,196.986 239.154,197.266 241.452,199.564 241.452,200.584 242.646,201.778 250.646,201.778 251.763,202.894 ccw(c251.655,203.002) 251.807,203.002 ccw(c251.655,203.002) 251.762,203.11 250.434,204.439 250.901,204.906 253.667,202.14 ccw(c253.774,202.247) 253.882,202.14 254.565,202.822 ; 254.564,202.822 ccw(c254.457,202.93) 254.609,202.93 ccw(c254.457,202.93) 254.564,203.038 ; 254.565,203.038 251.859,205.743 252.326,206.21 255.032,203.505 ccw(c255.139,203.612) 255.247,203.505 255.93,204.187 ccw(c255.822,204.295) 255.974,204.295 ccw(c255.822,204.295) 255.929,204.403 254.601,205.732 255.726,206.858 258.394,206.858 258.699,206.553 258.699,206.248 258.242,205.791 J14.17@257.734,205.791
  Bottom Layer w0.152: v1(214.377,186.895) 214.612,186.66 214.612,186.506 D1I.4@214.802,186.316
LVDS6_N: D1H.3 IC20H.1 J14.21 R131H.1 | length 76
  TopLayer w0.152: IC20H.1@210.685,183.48 210.035,183.48 v1(209.71,183.155) R131H.1@209.71,182.43 209.393,182.113 209.393,181.513 209.575,181.331 210.541,181.331 211.586,182.376 211.586,182.437 212.045,182.896 212.106,182.896 212.623,183.413 213.36,184.15 220.32,184.15 224.815,188.646 224.905,188.735 233.567,188.735 237.457,192.626 237.574,192.743 237.574,192.927 237.249,193.253 237.249,193.69 237.704,194.145 238.141,194.145 239.103,193.183 239.288,193.183 239.565,193.46 239.565,193.645 239.239,193.97 239.239,194.407 239.857,195.025 240.817,195.986 240.817,197.738 242.571,199.492 250.8,199.492 250.8,201.371 cw(c250.952,201.371) 250.952,201.524 251.917,201.524 cw(c251.917,201.371) 252.07,201.371 252.07,197.46 252.73,197.46 252.73,199.339 cw(c252.882,199.339) 252.882,199.492 258.039,199.492 258.801,200.254 258.801,201.345 258.597,201.549 258.292,201.854 258.14,201.854 257.658,201.371 J14.21@257.658,200.635 J14.21@257.683,200.635
  Bottom Layer w0.152: v1(209.71,183.155) 209.925,183.37 D1H.3@209.925,183.655
LVDS6_P: D1H.4 IC20H.8 J14.20 R131H.2 | length 77.3
  TopLayer w0.152: IC20H.8@207.585,183.48 208.366,183.48 v1(208.77,183.076) R131H.2@208.77,182.43 209.088,182.113 209.088,181.387 209.36,181.115 209.449,181.026 210.667,181.026 210.756,181.115 211.891,182.25 211.891,182.311 212.171,182.591 212.232,182.591 213.486,183.845 220.446,183.845 225.031,188.43 233.693,188.43 237.673,192.41 237.879,192.616 237.879,193.053 237.554,193.379 237.554,193.564 237.83,193.84 238.015,193.84 238.977,192.878 239.414,192.878 239.869,193.334 239.869,193.771 239.544,194.096 239.544,194.281 240.072,194.81 241.122,195.859 241.122,197.612 242.697,199.187 250.952,199.187 ccw(c250.952,199.339) 251.104,199.339 251.104,201.219 251.765,201.219 251.765,197.307 ccw(c251.917,197.307) 251.917,197.155 252.882,197.155 ccw(c252.882,197.307) 253.035,197.307 253.035,199.187 258.165,199.187 259.105,200.127 259.105,201.345 259.105,202.082 J14.20@260.198,203.175
  Bottom Layer w0.152: D1H.4@208.345,183.655 208.535,183.465 208.535,183.311 v1(208.77,183.076)
LVDS7_N: D1G.3 IC20G.1 J14.24 R131G.1 | length 76.1
  TopLayer w0.152: IC20G.1@212.427,181.098 213.077,181.098 v1(213.402,181.423) R131G.1@213.402,182.148 213.72,182.466 213.72,182.854 214.127,183.261 221.106,183.261 227.024,177.343 248.211,177.343 250.85,179.982 250.85,188.984 256.278,194.412 261.62,194.412 262.306,195.097 262.306,198.399 261.544,199.161 259.564,199.161 259.182,198.779 259.182,198.399 259.486,198.095 J14.24@260.198,198.095 J14.24@259.766,198.527
  Bottom Layer w0.152: D1G.3@213.187,180.923 213.187,181.208 v1(213.402,181.423)
LVDS7_P: D1G.4 IC20G.8 J14.23 R131G.2 | length 76.9
  TopLayer w0.152: IC20G.8@215.527,181.098 214.746,181.098 v1(214.342,181.502) R131G.2@214.342,182.148 214.025,182.466 214.025,182.728 214.253,182.956 220.98,182.956 224.818,179.119 226.898,177.038 248.337,177.038 251.155,179.856 251.155,188.857 256.405,194.107 261.746,194.107 262.521,194.882 262.611,194.971 262.611,198.526 262.521,198.615 261.759,199.377 261.67,199.466 259.437,199.466 258.877,198.906 258.877,198.653 258.319,198.095 J14.23@257.658,198.095
  Bottom Layer w0.152: v1(214.342,181.502) 214.577,181.267 214.577,181.113 D1G.4@214.767,180.923
LVDS8_N: D1P.6 IC20P.5 J24.3 | length 75.8
  TopLayer w0.152: v1(214.6,233.472) 214.6,233.671 214.703,233.773 IC20P.5@215.377,233.773
  Bottom Layer w0.152: v1@214.6,233.457 v1@214.615,233.472 ; v1(214.6,233.472) v1@214.615,233.472 ; D1P.6@214.617,234.098 214.617,233.474 v1@214.615,233.472 ; J24.3@243.561,223.495 244.678,224.612 247.065,224.612 248.082,225.629 248.082,228.955 247.564,229.472 246.149,230.888 242.709,234.328 240.436,234.328 240.027,234.328 239.76,234.06 239.76,233.756 239.099,233.756 239.099,235.674 238.921,235.852 238.008,235.852 237.829,235.674 237.829,233.631 237.169,233.631 237.169,235.674 236.99,235.852 236.077,235.852 235.899,235.674 235.899,233.631 235.238,233.631 235.238,235.674 235.06,235.852 234.147,235.852 233.968,235.674 233.968,233.631 233.308,233.631 233.308,235.674 233.13,235.852 232.217,235.852 232.038,235.674 232.038,233.631 231.378,233.631 231.378,235.674 231.199,235.852 230.286,235.852 230.108,235.674 230.108,233.631 229.447,233.631 229.447,235.674 229.269,235.852 228.356,235.852 228.177,235.674 228.177,233.631 227.517,233.631 227.517,235.674 227.338,235.852 226.425,235.852 226.247,235.674 226.247,234.417 226.158,234.328 225.992,234.328 217.432,234.328 216.401,233.298 214.863,233.298 214.69,233.472 v1@214.615,233.472